# Altium PCB Power_Inverter_350VDC.PcbDoc (part 3 of 3)
Units mm, origin at the board's own origin, x right, y up, seen from the top; angles counter-clockwise.
Board outline 340.25 x 180.25 mm, 2 copper layers (Top Layer, Bottom Layer); 181 components, 76 nets, 433 pads, 298 vias.
Unrouted connection lines stored in the file: 1.
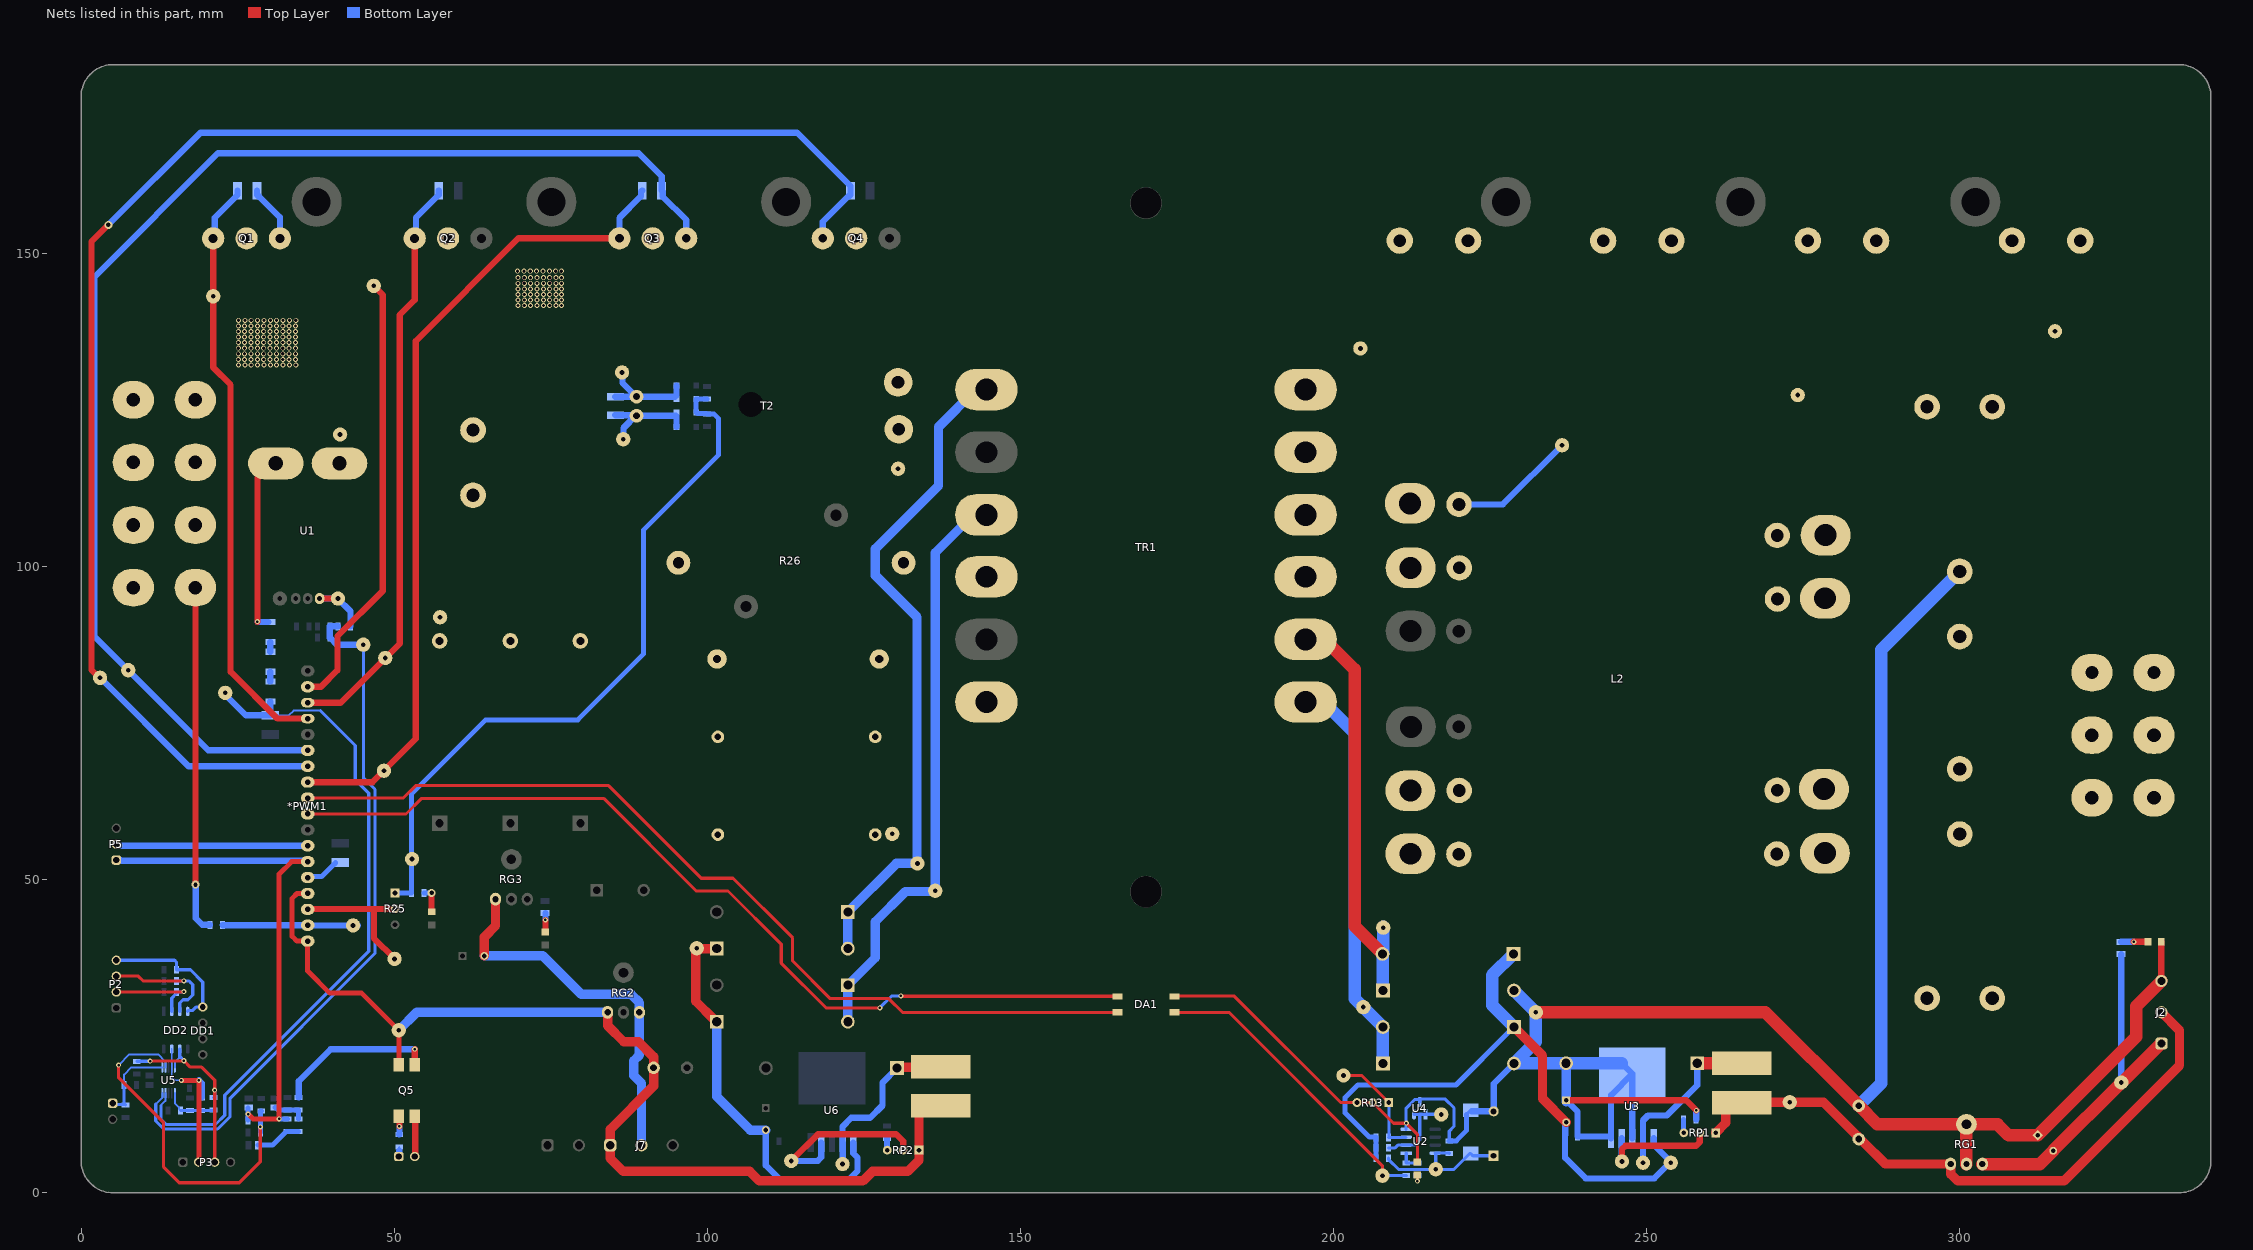
[diagram p2: the nets of this part, all layers, seen from the top]

## Via types
v1: diameter 0.8, hole 0.5, Top Layer to Bottom Layer, 266 vias
v2: diameter 0.8, hole 0.4, Top Layer to Bottom Layer, 28 vias
v3: diameter 1.27, hole 0.711, Top Layer to Bottom Layer, 4 vias

## Nets (pads, with @x,y where several pads share a name; then routed paths per layer and width w, separated by ;. In a path a pad name is that pad's centre, name@x,y a point inside that pad or via, vN(x,y) a via of type N, cw(c..) or ccw(c..) an arc to the next point about the centre after c; other vN are vias at no path point) (continued)
GND_II: C1.1 C2.1 C3.1 C4.2 C5.1 C6.2 C16.2 C30.2 CR1.2 D2.2 D4.2 D5.2 D6.2 D7.2 DA1.2 J2.3 J6.1 R10.1 R13.2 R13.3 RG1.2 TP14.1 TP16.1 U2.4 U3.3 U3.5 U3.6 U4.3 VD2.3 VD3.3 | length 413.8
  Top Layer w0.5: DA1.2@174.176,31.325 184.125,31.325 201.124,14.326 R13.3@203.71,14.326 R13.2@206.25,14.326 209.552,11.024 v2(211.584,11.024) 213.362,9.246 D7.2@213.362,4.835
  Top Layer w1: C1.1@237.125,14.675 256.325,14.675 v2(257.925,13.075) ; J2.3@332.2,33.775 D4.2@332.2,40.025
  Top Layer w2: TP14.1@232.285,28.733 268.959,28.733 C4.2@283.875,13.817 286.842,10.85 RG1.2@301.085,10.85 ; RG1.2@301.085,4.5 RG1.2@301.085,10.85 ; J2.3@332.225,33.75 328.175,29.7 328.175,24.8 C2.1@312.463,9.087 307.831,9.087 306.069,10.85 RG1.2@301.085,10.85
  Bottom Layer w0.5: U2.4@211.561,10.055 211.561,13.414 212.945,14.798 213.684,14.798 U4.3@213.743,14.739 ; U4.3@213.743,14.414 U4.3@213.743,14.739 ; C5.1@218.442,8.214 218.442,9.754 219.204,10.516 219.204,13.478 217.817,14.865 213.743,14.865 U4.3@213.743,14.739 ; C6.2@221.236,12.442 C6.2@221.871,13.077 C6.2@222.025,12.923
  Bottom Layer w0.8: C5.1@218.442,8.214 219.569,8.214 221.236,9.881 C6.2@221.236,12.442
  Bottom Layer w1: C6.2@222.025,12.923 D5.2@225.554,12.923 225.554,17.318 D6.2@228.785,20.549 ; C1.1@236.975,14.325 C1.1@237.135,14.485 ; C1.1@237.125,14.675 238.95,12.85 C3.1@238.95,8.9 244.292,8.9 U3.5@244.3,8.892 ; U3.5@244.3,8.609 U3.5@244.3,8.892 ; U3.6@246.018,20.6 U3.6@247.704,18.914 ; U3.3@247.704,8.609 U3.6@247.704,18.914 ; R10.1@257.9,11.625 257.912,11.638 257.912,13.062 v2(257.925,13.075) ; U3.5@244.3,8.892 244.3,15.51 U3.6@247.704,18.914
  Bottom Layer w1.5: D6.2@228.785,20.549 D6.2@228.81,20.575 ; CR1.2@237.11,20.575 CR1.2@237.135,20.6 C1.1@237.135,14.435
  Bottom Layer w2: D2.2@228.785,32.233 TP14.1@232.285,28.733 232.285,24.049 228.81,20.575 CR1.2@237.11,20.575 ; CR1.2@237.135,20.6 U3.6@246.018,20.6 ; C4.2@283.875,13.817 287.45,17.392 287.45,86.632 C30.2@300,99.182
GND_ISOL: C19.2 DD1.1 DD2.4 P2.4 | length 22.7
  Bottom Layer w0.5: P2.4@5.509,37.059 14.806,37.059 15.099,36.766 C19.2@15.099,35.535 17.34,35.535 19.306,33.569 DD1.1@19.306,29.596 19.276,29.566 18.214,29.566 17.655,29.007 16.944,29.007 16.898,28.961 DD2.4@16.898,28.883
Net*PWM1_1: *PWM1.1 *PWM1.4 C21.1 J7.1 L3.2 Q5.4 RG2.1 RP2.1 TP35.1 | length 168.8
  Top Layer w0.8: *PWM1.4@36.07,47.727 34.377,47.727 33.6,46.95 33.6,40.875 34.368,40.107 *PWM1.1@36.07,40.107 36.07,35.33 39.6,31.8 44.7,31.8 TP35.1@50.625,25.875 ; TP35.1@50.625,25.325 50.625,20.355 Q5.4@50.63,20.35
  Top Layer w1.5: RG2.1@83.985,28.725 84.038,28.672 84.038,26.562 86.575,24.025 88.925,24.025 91.341,21.609 91.341,16.966 84.4,10.025 J7.1@84.4,7.5 84.4,5.4 86.475,3.325 106.7,3.325 108.225,1.8 124.775,1.8 126.3,3.325 131.95,3.325 133.74,5.115 RP2.1@133.74,6.725 133.74,12.675 134.865,13.8 L3.2@137.225,13.8
  Bottom Layer w1.5: TP35.1@50.625,25.875 53.475,28.725 RG2.1@83.985,28.725
Net*PWM1_2: *PWM1.2 R19.2 TP21.1 | length 21.6
  Bottom Layer w1: R19.2@22.475,42.7 22.528,42.647 32.371,42.647 *PWM1.2@36.07,42.647 36.093,42.624 TP21.1@43.326,42.624 43.35,42.6 TP21.1@44.05,42.6
Net*PWM1_3: *PWM1.3 R25.2 TP28.1 | length 23.3
  Top Layer w1: *PWM1.3@36.114,45.231 46.65,45.231 ; TP28.1@49.95,37.275 46.65,40.575 46.65,45.231 ; R25.2@49.981,45.231 46.65,45.231
  Bottom Layer w1: *PWM1.3@36.07,45.187 *PWM1.3@36.114,45.231 ; R25.2@49.981,45.231 R25.2@50.025,45.275 R25.2@50.031,45.281
Net*PWM1_5: *PWM1.5 R20.2 | length 5.5
  Bottom Layer w0.8: *PWM1.5@36.07,50.267 36.207,50.404 38.266,50.404 40.213,52.351 40.274,52.351 40.515,52.592 R20.2@40.515,52.653
Net*PWM1_6: *PWM1.6 C28.1 P5.1 R24.2 R47.2 | length 83.1
  Top Layer w0.8: v2(26.568,12.479) 27.323,11.725 v2(31.525,11.725) 31.525,50.825 33.507,52.807 *PWM1.6@36.07,52.807
  Bottom Layer w0.5: R47.2@26.513,11.457 R47.2@26.568,11.513 ; C28.1@26.568,13.446 C28.1@26.624,13.501
  Bottom Layer w0.8: R47.2@26.568,11.513 v2(26.568,12.479) C28.1@26.568,13.446 ; v2(31.525,11.725) 31.555,11.695 R24.2@32.847,11.695
  Bottom Layer w1: P5.1@6.225,53.061 6.352,52.934 35.943,52.934 *PWM1.6@36.07,52.807
Net*PWM1_7: *PWM1.7 P5.2 | length 29.8
  Bottom Layer w1: 6.227,55.347 *PWM1.7@36.07,55.347
Net*PWM1_9: *PWM1.9 DA1.3 | length 146.9
  Top Layer w0.5: *PWM1.9@36.07,60.427 51.777,60.427 54.275,62.925 83.35,62.925 98.15,48.125 103.225,48.125 111.725,39.625 111.725,36.6 118.9,29.425 127.45,29.425 v2(127.475,29.45) ; v2(130.825,31.35) 130.865,31.31 165.387,31.31 DA1.3@165.427,31.27
  Bottom Layer w0.5: v2(127.475,29.45) 129.375,31.35 v2(130.825,31.35)
Net*PWM1_10: *PWM1.10 DA1.4 | length 147.7
  Top Layer w0.5: *PWM1.10@36.07,62.967 51.342,62.967 53.325,64.95 84.15,64.95 98.95,50.15 104.025,50.15 113.55,40.625 113.55,36.925 119.55,30.925 128.9,30.925 131.1,28.725 DA1.4@165.825,28.725
Net*PWM1_11: *PWM1.11 Q3.1 R29.2 TP30.1 | length 132.2
  Top Layer w1: *PWM1.11@36.07,65.507 46.407,65.507 53.325,72.425 53.325,135.975 69.737,152.387 Q3.1@85.868,152.387
  Bottom Layer w1: Q3.1@85.868,152.387 85.868,155.643 89.308,159.083 89.308,159.82 R29.2@89.51,160.022
Net*PWM1_12: *PWM1.12 Q4.1 R31.2 TP34.1 | length 251.3
  Top Layer w1: TP34.1@2.654,82.329 1.525,83.458 1.525,151.85 v3(4.225,154.55)
  Bottom Layer w1: TP34.1@2.9,82.175 17.028,68.047 *PWM1.12@36.07,68.047 ; v3(4.225,154.55) 18.95,169.275 114.259,169.275 122.811,160.723 122.811,159.321 122.609,159.119 122.444,159.119 118.368,155.043 Q4.1@118.368,152.387
Net*PWM1_13: *PWM1.13 Q3.3 Q4.2 R29.1 T2.1 TP33.1 | length 211
  Bottom Layer w1: *PWM1.13@36.07,70.587 20.188,70.587 7.388,83.388 2.025,88.75 2.025,146.275 21.725,165.975 88.975,165.975 92.65,162.3 92.65,160.06 R29.1@92.612,160.022 92.814,159.82 92.814,159.061 96.536,155.339 Q3.3@96.536,152.387
Net*PWM1_15: *PWM1.15 Q1.1 R18.2 TP19.1 | length 95.1
  Top Layer w1: Q1.1@20.968,152.387 20.968,143.125 20.968,131.757 23.751,128.974 23.751,83.16 31.244,75.667 *PWM1.15@36.07,75.667
  Bottom Layer w1: Q1.1@20.968,152.387 21.208,152.627 21.208,155.662 24.867,159.321 R18.2@24.867,160.022
Net*PWM1_16: *PWM1.16 Q2.1 R22.2 TP23.1 | length 93.6
  Top Layer w1: *PWM1.16@36.07,78.207 41.332,78.207 50.775,87.65 50.775,140.156 53.168,142.549 Q2.1@53.168,152.387
  Bottom Layer w1: Q2.1@53.168,152.387 53.366,152.585 53.366,155.662 57.025,159.321 R22.2@57.025,160.022
Net*PWM1_17: *PWM1.17 C10.2 C11.2 Q1.3 Q2.2 R18.1 TP20.1 | length 80.1
  Top Layer w1: *PWM1.17@36.07,80.747 38.197,80.747 40.825,83.375 40.825,88.8 48.075,96.05 48.075,143.35 TP20.1@46.625,144.8
  Bottom Layer w1: R18.1@27.969,160.022 27.969,159.321 28.171,159.119 28.281,159.119 31.636,155.764 Q1.3@31.636,152.387
  other v1: 69.657,141.656 70.673,141.656 71.689,141.656 72.705,141.656 73.721,141.656 74.737,141.656 75.753,141.656 76.642,141.656 69.657,142.545 70.673,142.545 71.689,142.545 72.705,142.545 73.721,142.545 74.737,142.545 75.753,142.545 76.642,142.545 69.657,143.434 70.673,143.434 71.689,143.434 72.705,143.434 73.721,143.434 74.737,143.434 75.753,143.434 76.642,143.434 69.657,144.323 70.673,144.323 71.689,144.323 72.705,144.323 73.721,144.323 74.737,144.323 75.753,144.323 76.642,144.323 69.657,145.212 70.673,145.212 71.689,145.212 72.705,145.212 73.721,145.212 74.737,145.212 75.753,145.212 76.642,145.212 69.657,146.101 70.673,146.101 71.689,146.101 72.705,146.101 73.721,146.101 74.737,146.101 75.753,146.101 76.642,146.101 69.596,147.142 70.612,147.142 71.628,147.142 72.644,147.142 73.66,147.142 74.676,147.142 75.692,147.142 76.581,147.142
NetC1_2: C1.2 C3.2 D1.1 D3.1 R2.2 R3.2 R4.2 TP5.1 U3.1 | length 106.8
  Top Layer w1.5: D3.1@228.785,26.391 233.35,21.826 233.35,14.95 C1.2@237.125,11.175
  Bottom Layer w0.8: R4.2@206.774,5.436 R2.2@206.774,7.087 206.774,8.783 205.697,8.783 201.805,12.675 201.805,15.088 203.837,17.12 219.514,17.12 228.085,25.691 D3.1@228.785,26.391
  Bottom Layer w1: C1.2@236.975,10.775 236.975,9.15 236.95,9.125 C3.2@236.95,8.9 236.95,5.475 240.225,2.2 251.2,2.2 253.85,4.85 251.116,7.584 251.108,7.592 U3.1@251.108,8.609
  Bottom Layer w2: D1.1@228.714,38.075 225.3,34.661 225.3,29.876 D3.1@228.785,26.391
NetC2_2: C2.2 J2.1 R5.2 RG1.3 TP4.1 | length 56.9
  Top Layer w2: RG1.3@303.625,4.497 RG1.3@303.625,4.5 312.825,4.5 C2.2@314.937,6.613 314.937,6.637 TP4.1@325.825,17.525 325.902,17.525 326.045,17.668 326.066,17.668 J2.1@332.148,23.75
  Bottom Layer w1: TP4.1@325.825,17.602 R5.2@325.825,38
NetC4_1: C4.1 J2.2 L1.2 RG1.1 RP1.1 TP1.1 | length 101
  Top Layer w1.5: RP1.1@261.015,9.475 262.619,11.079 262.619,13.2 263.744,14.325 L1.2@265.2,14.325 265.25,14.375 TP1.1@272.85,14.375 278.25,14.375 283.625,9 283.625,8.868 283.877,8.617 284.008,8.617 284.008,8.485 284.26,8.233 284.392,8.233 288.125,4.5 RG1.1@298.545,4.5 298.598,4.447 298.598,2.877 299.675,1.8 316.675,1.8 335.125,20.25 335.125,25.85 J2.2@332.225,28.75
NetC5_2: C5.2 C6.1 D5.1 R4.1 TP6.1 U2.8 | length 23.8
  Bottom Layer w0.5: R4.1@208.774,5.436 208.774,5.211 210.362,3.623 219.167,3.623 221.721,6.177 C6.1@221.871,6.177 222.225,5.823 D5.1@225.554,5.823 ; TP6.1@216.283,3.658 216.283,6.225 216.263,6.245 U2.8@216.193,6.245 216.201,6.236 218.419,6.236 C5.2@218.442,6.214
NetC7_1: C7.1 R8.1 R12.2 TP13.1 U5.5 | length 112.8
  Bottom Layer w0.3: 11.8,14.075 12.845,15.12 U5.5@12.845,15.832
  Bottom Layer w0.5: 11.8,14.075 11.8,11.375 13.075,10.1 21.675,10.1 23.675,12.1 23.675,15 46.825,38.15 46.825,64.35 44.96,66.215 TP13.1@44.96,87.478
  Bottom Layer w1: R8.1@40.912,90.399 R12.2@39.61,90.399 C7.1@39.61,88.621 39.61,88.596 39.71,88.496 39.735,88.496 40.753,87.478 TP13.1@44.96,87.478
NetC9_2: C9.2 J3.1 J9.1 R15.2 R16.2 R17.2 R19.1 TP18.1 | length 55.6
  Top Layer w1: J3.1@18.13,96.593 18.14,96.583 18.14,49.16 v3(18.15,49.15)
  Bottom Layer w1: v3(18.15,49.15) 18.175,49.125 18.175,43.775 19.219,42.731 20.444,42.731 R19.1@20.475,42.7
NetC10_1: C10.1 C11.1 C14.2 TP26.1 TR1.1
NetC12_1: C12.1 C13.1 D9.2 D11.2 R23.2 R25.1 TP24.1 | length 115.2
  Bottom Layer w0.8: R25.1@50.025,47.815 R23.2@52.692,47.815 52.692,52.15 52.692,53.225 52.692,63.667 64.5,75.475 79.225,75.475 89.75,86 89.75,105.825 101.725,117.8 101.725,123.575 101.008,124.292 C12.1@99.875,124.292 99.775,124.392 98.318,124.392 D11.2@98.148,124.562 D9.2@98.148,126.721 99.859,126.721 C13.1@99.875,126.737
NetC14_1: C14.1 R26.2
NetC15_2: C15.2 C16.1 J5.1 L2.1 L2.2 L2.3 L2.4
NetC17_2: C17.2 P1.1 R32.1 U5.6 | length 13.3
  Bottom Layer w0.3: R32.1@6.749,17.12 6.749,18.774 7.907,19.932 U5.6@12.845,19.932
  Bottom Layer w0.5: P1.1@4.909,14.199 5.079,14.029 6.887,14.029 C17.2@6.987,13.929 ; C17.2@6.71,14.206 R32.1@6.71,17.12
NetC20_2: C20.2 C29.2 D13.1 D15.1 TP38.1 U6.1 | length 65.1
  Top Layer w1.5: TP38.1@97.862,38.918 D15.1@101.42,38.918 ; TP38.1@98.075,38.612 98.075,30.508 100.999,27.584 101.07,27.584 101.349,27.305 D13.1@101.349,27.234
  Bottom Layer w1: C20.2@109.25,9.925 109.25,4.275 111.65,1.875 122.4,1.875 123.925,3.4 123.925,5.525 123.239,6.211 123.239,7.9 U6.1@123.231,7.908
  Bottom Layer w1.5: D13.1@101.42,27.234 101.42,15.28 106.775,9.925 C20.2@109.25,9.925
NetC22_2: C22.2 J7.2 RG2.3 RG3.1 | length 61.4
  Top Layer w1.5: C22.2@64.3,37.75 64.3,40.775 66.077,42.552 RG3.1@66.077,46.827
  Bottom Layer w1.5: C22.2@64.3,37.75 73.65,37.75 79.8,31.6 87.75,31.6 89.062,30.288 89.062,28.98 89.065,28.977 89.065,21.915 88.15,21 88.15,18.65 89.4,17.4 J7.2@89.4,7.5
NetC24_1: C24.1 R24.1 R44.2 | length 7.4
  Bottom Layer w0.8: C24.1@28.136,7.52 30.447,7.52 32.622,9.695 R24.1@32.847,9.695 R44.2@34.625,9.695
NetC25_1: C25.1 R44.1 R45.2 R46.1 | length 5.4
  Bottom Layer w0.8: C25.1@30.815,13.501 31.015,13.501 31.392,13.124 R45.2@34.625,13.124 R44.1@34.625,11.695
NetC26_2: C26.2 R47.1 R48.2 U5.7 | length 55.9
  Top Layer w0.5: v2(5.875,20.3) 5.875,18.275 13.05,11.1 13.05,4 15.55,1.5 25.15,1.5 28.5,4.85 v2(28.5,10.425)
  Bottom Layer w0.3: v2(5.875,20.3) 7.6,22.025 12.159,22.025 13.345,20.839 U5.7@13.345,19.932
  Bottom Layer w0.8: R48.2@28.513,9.552 R47.1@28.513,11.457 28.513,12.997 C26.2@28.656,12.997
NetC27_2: C27.2 C30.1
NetCR1_1: CR1.1 L1.1 TP2.1 U3.2 | length 28.4
  Top Layer w1: L1.1@265.175,20.6 L1.1@265.2,20.575
  Top Layer w2: CR1.1@258.075,20.6 L1.1@265.175,20.6
  Bottom Layer w1: TP2.1@249.403,4.703 249.403,8.606 U3.2@249.406,8.609 249.406,11.456 250.2,12.25 253.225,12.25 258.075,17.1 CR1.1@258.075,20.6
NetCR2_1: CR2.1 L3.1 TP36.1 U6.2 | length 27.7
  Top Layer w1.5: CR2.1@130.215,19.825 130.328,19.938 137.113,19.938 L3.1@137.225,20.05
  Bottom Layer w1: U6.2@121.525,7.897 121.525,10.5 122.9,11.875 125.925,11.875 127.9,13.85 127.9,17.51 CR2.1@130.215,19.825 ; TP36.1@121.54,4.611 U6.2@121.54,7.897
NetD1_2: D1.2 D2.1 TP3.1 TR1.8 | length 67.9
  Top Layer w1: D2.1@207.809,32.269 D2.1@207.845,32.233
  Top Layer w2: TR1.8@195.502,90.322 196.548,90.322 203.329,83.541 203.329,42.52 D1.2@207.774,38.075
  Bottom Layer w2: D1.2@207.812,37.983 207.845,37.95 D2.1@207.845,32.233 ; D1.2@207.901,38.202 TP3.1@207.901,42.393
NetD3_2: D3.2 D6.1 TP11.1 TR1.7 | length 65.4
  Bottom Layer w2: TR1.7@195.502,80.322 196.388,80.322 203.329,73.381 203.329,30.907 D3.2@207.845,26.391 D6.1@207.845,20.549
NetD4_1: D4.1 R5.1 | length 4.3
  Top Layer w1: v2(327.825,40) 330.05,40 D4.1@330.05,39.975
  Bottom Layer w1: R5.1@325.8,39.975 325.825,40 v2(327.825,40)
NetD7_1: D7.1 R9.2 | length 1.9
  Top Layer w0.5: v2(213.362,1.753) D7.1@213.362,2.735
  Bottom Layer w0.5: v2(213.362,1.753) R9.2@213.362,2.658
NetD8_2: D8.2 D9.1 R21.2 T2.3 TP22.1 | length 16.3
  Bottom Layer w1: R21.2@85.225,127.076 85.238,127.089 88.508,127.089 88.521,127.102 94.744,127.102 94.998,127.356 D8.2@94.998,128.88 ; TP22.1@86.3,131.08 86.355,131.025 86.355,129.292 T2.3@88.515,127.132
NetD10_2: D10.2 D11.1 R21.1 T2.4 TP27.1 | length 16.4
  Bottom Layer w1: R21.1@85.225,124.174 85.285,124.114 88.461,124.114 88.521,124.054 94.871,124.054 94.998,123.927 D10.2@94.998,122.276 ; TP27.1@86.525,120.068 86.525,122.094 T2.4@88.515,124.084
NetD12_1: D12.1 R23.1 | length 4.2
  Top Layer w1: D12.1@55.867,44.801 v3(55.867,47.815)
  Bottom Layer w0.8: R23.1@54.692,47.815 v3(55.867,47.815)
NetD13_2: D13.2 D14.1 TP39.1 TR1.4 | length 94.1
  Bottom Layer w1.5: D13.2@122.36,27.234 D14.1@122.36,33.076 126.75,37.466 126.75,43.2 131.582,48.032 136.207,48.032 TP39.1@136.325,48.15 136.325,102.15 142.397,108.222 TR1.4@144.502,108.222
NetD15_2: D15.2 D17.1 TP41.1 TR1.6 | length 107
  Bottom Layer w1.5: D15.2@122.36,38.918 D17.1@122.36,44.76 130.125,52.525 TP41.1@133.475,52.525 ; TP41.1@133.425,52.525 133.425,91.875 126.775,98.525 126.775,102.8 136.85,112.875 136.85,122.27 142.802,128.222 TR1.6@144.502,128.222
NetD16_1: D16.1 R41.1 | length 3
  Top Layer w1: D16.1@74.05,41.6 v2(74.05,43.5)
  Bottom Layer w1: v2(74.05,43.5) R41.1@74.05,44.575
NetDA1_1: DA1.1 R6.1 TP8.1 | length 48.7
  Top Layer w0.5: DA1.1@174.587,28.7 183.3,28.7 207.758,4.242 207.758,2.658 TP8.1@207.774,2.642
  Bottom Layer w0.5: TP8.1@207.774,2.642 211.203,2.642 211.211,2.65 211.576,2.65 R6.1@211.584,2.658
NetDD2_2: DD2.2 P2.2 R37.1 | length 15.3
  Top Layer w0.5: P2.2@5.654,32.042 5.694,32.002 16.277,32.002 v2(16.3,32.025)
  Bottom Layer w0.5: DD2.2@14.358,28.883 14.358,31.013 15.099,31.754 R37.1@15.099,31.979 15.122,32.002 16.277,32.002 v2(16.3,32.025)
NetDD2_3: DD2.3 P2.3 R35.1 | length 19.5
  Top Layer w0.5: P2.3@5.509,34.519 9.019,34.519 9.788,33.75 v2(16.275,33.75)
  Bottom Layer w0.5: R35.1@15.099,33.757 15.103,33.754 16.271,33.754 v2(16.275,33.75) 17.125,33.75 17.4,33.475 17.407,33.475 17.7,33.182 17.7,31.5 16.95,30.75 16.15,30.75 15.628,30.228 DD2.3@15.628,28.883
NetDD2_6: DD2.6 P3.3 R36.1 R39.1 U5.10 | length 32.3
  Top Layer w0.5: v2(10.9,20.95) 10.925,20.975 16.275,20.975 v2(16.3,21) 17.325,19.975 19.125,19.975 21.214,17.886 21.214,16.293 21.214,4.804 P3.3@21.211,4.801
  Bottom Layer w0.3: U5.10@14.845,19.932 14.845,20.77 15.628,21.553
  Bottom Layer w0.5: R36.1@8.775,20.875 8.812,20.913 10.863,20.913 v2(10.9,20.95) ; 15.628,21.553 DD2.6@15.628,22.883 ; 15.687,21.612 v2(16.3,21) ; R39.1@21.043,15.1 21.068,15.1 21.218,15.25 v2(21.218,16.293)
NetDD2_7: DD2.7 P3.2 R34.1 R38.1 U5.9 | length 25.2
  Top Layer w0.8: v2(15.9,17.875) v2(18.7,17.875) 18.7,4.83 P3.2@18.671,4.801
  Bottom Layer w0.3: DD2.7@14.358,22.883 14.345,22.87 U5.9@14.345,19.932 14.345,18.455 14.925,17.875 v2(15.9,17.875) ; R38.1@19.052,15.072 R38.1@19.163,15.183
  Bottom Layer w1: v2(18.7,17.875) 19.163,17.412 R38.1@19.163,15.183
NetL2_5: L2.5 L2.6 L2.7 L2.8 TP29.1 TR1.9 TR1.10 | length 20.4
  Bottom Layer w1: L2.5@220.011,109.876 227.026,109.876 TP29.1@236.475,119.325
NetP4_1: P4.1 R42.1 | length 0.8
  Bottom Layer w0.3: R42.1@50.68,7.18 R42.1@50.7,7.2
  Bottom Layer w1: P4.1@50.705,5.825 50.705,6.63
NetP4_2: P4.2 Q5.2 | length 6.5
  Top Layer w0.3: Q5.2@53.17,12.15 Q5.2@53.245,12.075
  Top Layer w1: P4.2@53.18,5.69 53.245,5.756 Q5.2@53.245,12.075
NetQ1_2: Q1.2 Q3.2 R1.2 U1.5 | length 28.9
  Top Layer w0.254: U1.5@28.196,114.205 30.425,116.434 U1.5@30.99,116.434
  Top Layer w1: v2(28.05,91.15) 28.05,114.121 28.134,114.205 U1.5@28.196,114.205
  Bottom Layer w0.254: R1.2@29.801,91.11 R1.2@30.101,91.11
  Bottom Layer w1: v2(28.05,91.15) 28.09,91.11 R1.2@29.801,91.11
  other v1: 25.021,132.182 26.037,132.182 27.053,132.182 28.069,132.182 29.085,132.182 30.101,132.182 31.117,132.182 32.133,132.182 33.149,132.182 34.165,132.182 24.983,133.054 25.999,133.054 27.015,133.054 28.031,133.054 29.047,133.054 30.063,133.054 31.079,133.054 32.095,133.054 33.111,133.054 34.127,133.054 24.983,133.943 25.999,133.943 27.015,133.943 28.031,133.943 29.047,133.943 30.063,133.943 31.079,133.943 32.095,133.943 33.111,133.943 34.127,133.943 24.983,134.832 25.999,134.832 27.015,134.832 28.031,134.832 29.047,134.832 30.063,134.832 31.079,134.832 32.095,134.832 33.111,134.832 34.127,134.832 24.983,135.721 25.999,135.721 27.015,135.721 28.031,135.721 29.047,135.721 30.063,135.721 31.079,135.721 32.095,135.721 33.111,135.721 34.127,135.721 24.983,136.61 25.999,136.61 27.015,136.61 28.031,136.61 29.047,136.61 30.063,136.61 31.079,136.61 32.095,136.61 33.111,136.61 34.127,136.61 24.983,137.499 25.999,137.499 27.015,137.499 28.031,137.499 29.047,137.499 30.063,137.499 31.079,137.499 32.095,137.499 33.111,137.499 34.127,137.499 24.983,138.388 25.999,138.388 27.015,138.388 28.031,138.388 29.047,138.388 30.063,138.388 31.079,138.388 32.095,138.388 33.111,138.388 34.127,138.388 25.021,139.294 26.037,139.294 27.053,139.294 28.069,139.294 29.085,139.294 30.101,139.294 31.117,139.294 32.133,139.294 33.149,139.294 34.165,139.294
NetQ5_1: Q5.1 R42.2 | length 3
  Top Layer w0.3: Q5.1@50.63,12.15 Q5.1@50.7,12.08
  Top Layer w1: Q5.1@50.7,12.08 50.725,12.055 v2(50.725,10.5)
  Bottom Layer w0.3: R42.2@50.675,9.225 R42.2@50.7,9.2
  Bottom Layer w1: R42.2@50.675,9.225 50.725,9.275 v2(50.725,10.5)
NetQ5_3: Q5.3 R45.1 | length 25.9
  Top Layer w0.3: Q5.3@53.025,20.495 Q5.3@53.17,20.35
  Top Layer w1: Q5.3@53.025,20.495 53.175,20.645 53.173,20.647 53.173,22.848 v2(53.175,22.85)
  Bottom Layer w1: R45.1@34.625,15.124 34.625,17.75 39.725,22.85 v2(53.175,22.85)
NetR1_1: R1.1 R7.2 | length 1.6
  Bottom Layer w1: R7.2@30.101,86.335 R1.1@30.101,87.91
NetR2_1: R2.1 TP12.1 U2.2 U4.1 U4.2 | length 14
  Bottom Layer w0.5: R2.1@208.774,7.087 209.806,7.087 210.234,7.515 212.901,7.515 213.743,8.357 213.743,12.46 ; U4.2@212.828,12.46 213.743,12.46 ; TP12.1@217.172,12.421 217.133,12.46 U4.1@214.658,12.46 213.743,12.46
NetR3_1: R3.1 R13.1 TP10.1 U2.3 | length 17.7
  Top Layer w0.5: TP10.1@201.551,18.644 204.472,18.644 R13.1@208.79,14.326
  Bottom Layer w0.5: TP10.1@201.551,18.644 TP10.1@201.975,18.644 ; R3.1@208.774,8.738 R3.1@208.797,8.761 ; R13.1@208.845,14.254 208.845,8.81 R3.1@208.797,8.761 ; U2.3@211.538,8.761 R3.1@208.797,8.761
NetR6_2: R6.2 R9.1 U2.1 | length 3.4
  Bottom Layer w0.5: U2.1@211.561,6.245 211.573,6.233 211.573,4.67 R6.2@211.584,4.658 R9.1@213.362,4.658
NetR7_1: R7.1 R11.2 | length 1.5
  Bottom Layer w1: R11.2@30.101,81.585 R7.1@30.101,83.135
NetR8_2: R8.2 TP9.1 U1.3 | length 11.1
  Top Layer w1: U1.3@37.975,94.844 TP9.1@40.896,94.844
  Bottom Layer w1: U1.3@37.975,94.844 TP9.1@40.896,94.844 42.912,92.828 R8.2@42.912,90.399
NetR10_2: R10.2 RP1.3 | length 2.2
  Bottom Layer w0.8: R10.2@255.9,11.625 255.9,9.51 RP1.3@255.935,9.475
NetR11_1: R11.1 R14.2 TP15.1 U5.4 | length 112.3
  Bottom Layer w0.3: 12.625,13.875 13.345,14.595 U5.4@13.345,15.832 ; R14.2@30.101,76.202 33.077,76.202 33.825,76.95 38.1,76.95
  Bottom Layer w0.5: 12.625,13.875 12.625,11.65 13.45,10.825 21.35,10.825 22.825,12.3 22.825,15.5 45.825,38.5 45.825,63.75 43.675,65.9 43.675,71.375 38.1,76.95
  Bottom Layer w1: TP15.1@22.9,79.775 22.9,79.5 26.198,76.202 R14.2@30.101,76.202 R11.1@30.101,78.385
NetR26_1: R26.1 T2.2 TP32.1 TR1.3 | length 0.3
  Bottom Layer w0.254: R26.1@131.286,100.559 R26.1@131.404,100.44 ; TR1.3@144.384,100.44 TR1.3@144.502,100.322
NetR33_1: R33.1 R38.2 R39.2 R40.2 U5.1 | length 8.2
  Bottom Layer w0.3: U5.1@14.845,15.832 14.845,14.215 15.484,13.576 15.484,13.306 R40.2@15.734,13.056 R40.2@15.75,13.072
  Bottom Layer w0.5: R40.2@15.75,13.072 R33.1@17.274,13.072 R38.2@19.052,13.072 R39.2@20.83,13.072
NetR43_2: R43.2 RP2.3 | length 1.9
  Bottom Layer w1: R43.2@128.625,8.6 128.642,8.582 128.642,6.743 RP2.3@128.66,6.725
NetRP1_2: RP1.2 TP7.1 U3.4 | length 20.1
  Top Layer w1: TP7.1@246.038,4.912 246.038,6.839 246.624,7.425 257.889,7.425 258.475,8.011 RP1.2@258.475,9.475
  Bottom Layer w1: U3.4@246.002,8.609 246.002,4.948 TP7.1@246.075,4.875
NetRP2_2: RP2.2 TP40.1 U6.4 | length 28.9
  Top Layer w1: TP40.1@113.325,5 117.6,9.275 130.075,9.275 131.2,8.15 RP2.2@131.2,6.725
  Bottom Layer w1: TP40.1@113.325,5 117.539,5 118.125,5.586 U6.4@118.125,7.908
NetTP25_1: TP25.1 TR1.11 VD1.3 VD3.1
NetTP31_1: TP31.1 TR1.12 VD2.1 VD4.3
VCC: C9.1 J1.1 J8.1 TP17.1 U1.4
"VCC +320": C15.1 C27.1 J4.1 VD1.1 VD4.1
pads on no net: L2.9 L2.10 R26.GND Radiator_1.1 Radiator_2.1 T2.106 TR1.0 TR1.2 TR1.5 U2.5 U2.6 U2.7 U5.2

## Polygon pours and split planes (outlines as drawn)
NetC27_2 on Bottom Layer "NONET_L-01_P-001" (solid, pour order 27): 301.625,65.275 298.241,65.275 295.7,67.816 295.7,68.9 295.7,89 298,91.3 301.325,91.3 303.75,88.875 303.75,67.4
GND_II on Bottom Layer "NONET_L-01_P-001" (solid, pour order 16): 283.2,149.5 283.2,167.7 292.575,177.075 321.175,177.075 335.002,163.248 335.002,78.969 315.156,78.969 307.654,86.471 307.654,91.396 302.975,96.075 299.277,96.075 297.5,97.589 297.5,100.4 297.5,118.75 301.675,122.925 301.675,128.931 314.581,141.407 314.581,155.296 305.818,164.059 299.595,164.059 295.277,159.741 295.277,149.5
GND on Bottom Layer "NONET_L-01_P-001" (solid, pour order 25): 126.9,154.475 126.9,150.975 124.625,148.7 120.275,148.7 113.55,141.975 113.55,122.825 104.375,113.65 104.375,100.65 109.9,95.125 109.9,76.85 103.125,70.075 64,70.075 55.15,61.225 55.15,56.075 59.7,51.525 105.55,51.525 123.425,69.4 123.425,100.65 117.175,106.9 117.175,109.875 125.775,118.475 125.775,131.85 138.55,144.625 138.55,171.6 132.6,177.55 122.425,177.55 122.425,164.9 125.2,162.125 125.2,157.025 126.9,155.325
NetTP31_1 on Bottom Layer "NONET_L-01_P-001" (solid, pour order 22): 189.875,124.8 189.85,124.825 189.85,165.575 201.15,176.875 272.2,176.875 280.625,168.45 280.625,149.475 273.2,149.475 270.95,151.725 270.95,161.1 268,164.05 261.9,164.05 257.05,159.2 234.85,159.2 230.25,163.8 224.775,163.8 217.025,156.05 208.912,156.05 206.5,153.638 206.5,148.775 208.275,147 208.275,134.975 202.175,128.875 202.175,124.828
"VCC +320" on Bottom Layer "NONET_L-01_P-001" (solid, pour order 17): 335.033,77.075 312.812,77.075 306.125,70.557 306.125,66.275 302.65,62.8 300.103,62.8 296.42,59.117 296.42,36.204 298.051,34.574 300.525,32.099 300.525,31.1 303.903,28.075 307.95,28.075 315.65,35.775 315.65,57.692 315.65,65.8 318.024,68.174 326.132,68.174 335.033,68.174
NetL2_5 on Bottom Layer "NONET_L-01_P-001" (solid, pour order 14): 189.486,112.37 205.869,112.37 207.774,114.275 225.837,114.275 236.6,103.512 236.6,59.535 226.443,49.378 208.028,49.378 208.028,67.92 218.545,67.92 223.141,72.516 223.141,91.542 220.347,94.336 189.486,94.336
NetC9_2 on Bottom Layer "NONET_L-01_P-001" (solid, pour order 11): 54.866,85.954 81.155,85.954 82.044,86.843 82.044,96.749 65.718,113.075 49.154,99.667 54.866,93.955
Net*PWM1_17 on Bottom Layer "NONET_L-01_P-001" (solid, pour order 2): 29.593,154.407 29.593,147.422 36.07,140.945 77.218,140.945 77.218,148.692 63.096,148.692 60.708,150.863 60.708,154.407 56.263,154.407 56.263,150.851 54.104,148.692 39.245,148.692 33.53,154.407
NetQ1_2 on Bottom Layer "NONET_L-01_P-001" (solid, pour order 7): 93.855,154.28 93.855,142.469 82.298,130.912 24.132,130.912 24.132,139.802 78.107,139.802 88.521,150.216 88.521,154.28
NetC14_1 on Bottom Layer "NONET_L-01_P-001" (solid, pour order 9): 99.443,82.398 91.95,89.891 91.95,101.956 93.474,103.48 98.046,103.48 99.824,101.702 99.824,94.082 104.65,89.256 104.65,84.303 102.745,82.398
NetC9_2 on Bottom Layer "NONET_L-01_P-001" (solid, pour order 8): 5.002,110.338 56.898,110.338 60.962,114.402 64.391,114.402 66.042,112.751 66.042,107.925 55.755,97.638 47.627,97.638 27.307,97.638 21.338,91.669 21.211,91.796 5.002,91.796
VCC on Bottom Layer "NONET_L-01_P-001" (solid, pour order 0): 5.082,112.497 23.497,112.497 23.497,116.053 27.18,119.736 34.673,119.736 36.705,117.704 36.705,114.783 37.975,113.513 55.12,113.513 65.407,123.8 65.407,125.832 61.343,129.896 5.082,129.896
NetR26_1 on Top Layer "NONET_L-01_P-001" (solid, pour order 4): 150.497,94.59 123.7,94.59 123.7,124.562 135.257,124.562 135.257,106.655 139.829,102.083 150.497,102.083
Net*PWM1_13 on Top Layer "NONET_L-01_P-001" (solid, pour order 3): 94.49,154.28 94.49,147.676 105.158,137.008 113.159,137.008 123.7,126.467 135.257,126.467 135.257,138.278 125.986,147.549 125.986,154.28 121.541,154.28 121.541,150.724 119.89,149.073 104.015,149.073 98.808,154.28
"VCC +320" on Top Layer "NONET_L-01_P-001" (solid, remove dead copper, pour order 23): 336.325,69.275 313.65,69.275 306.525,76.4 306.525,101.825 313.35,108.65 313.35,119.575 318.45,124.675 318.45,144.275 323.775,149.6 323.775,153.95 320.675,157.05 312.925,157.05 305.85,164.125 299.625,164.125 294.6,159.1 273.35,159.1 268.325,164.125 261.969,164.125 255.644,157.8 248.9,157.8 245.575,154.475 236.375,154.475 236.375,164.125 207.012,164.125 207.012,165.262 220.275,178.525 323.5,178.525 338.75,163.275 338.75,71.7
NetC15_2 on Top Layer "NONET_L-01_P-001" (solid, pour order 18): 334.7,66.45 334.7,57.559 315.766,38.625 303.225,38.625 299.313,34.713 299.313,30.913 296.425,28.025 289.198,28.025 273.687,43.536 267.972,49.251 267.972,109.195 278.927,120.15 285.257,120.15 293.168,128.061 296.51,128.04 299.313,125.237 299.313,113.313 294.375,108.375 294.375,94.958 292.85,93.433 292.85,67.325 297.375,62.8 303.475,62.8 307.125,66.45
GND_II on Top Layer "NONET_L-01_P-001" (solid, pour order 28): 305.625,128.5 303.45,128.5 301.825,126.875 301.825,112.05 297.55,107.775 297.55,97.75 298.925,96.375 302,96.375 304.45,98.825 304.45,103.5 309.575,108.625 309.575,128.5
NetC27_2 on Top Layer "NONET_L-01_P-001" (solid, pour order 26): 301.625,65.275 298.241,65.275 295.7,67.816 295.7,68.9 295.7,89 298,91.3 301.325,91.3 303.75,88.875 303.75,67.4
GND on Top Layer "NONET_L-01_P-001" (solid, pour order 24): 61.425,150.2 61.425,170.3 68.675,177.55 132.65,177.55 136.5,173.7 136.5,155.025 131.475,150 128.325,150 127.125,151.2 127.125,155.1 124.725,157.5 121.825,157.5 115.625,163.7 72.075,163.7 69.15,160.775 69.15,154.175 65.175,150.2
"VCC +320" on Top Layer "NONET_L-01_P-001" (solid, pour order 15): 207.012,149.708 207.012,165.262 215.842,174.092 237.365,174.092 246.382,165.075 246.382,151.282 244.808,149.708 240.286,149.708 233.682,156.312 233.682,160.376 230.253,163.805 224.792,163.805 214.886,153.899 214.886,151.519 213.075,149.708
NetTP25_1 on Top Layer "NONET_L-01_P-001" (solid, pour order 20): 189.875,122.7 189.875,114.475 191.225,113.125 206.5,113.125 208.25,114.875 227.175,114.875 236.25,123.95 284.575,123.95 291.525,130.9 301.675,130.9 311.65,140.875 311.65,152.55 309.836,154.364 306.922,154.364 303.333,150.775 294.286,150.775 290.111,146.6 264.8,146.6 256.7,154.7 251.8,154.7 249.6,152.5 249.6,147.6 247.55,145.55 230.85,145.55 213.875,128.575 206.25,128.575 200.375,122.7
NetTP31_1 on Top Layer "NONET_L-01_P-001" (solid, pour order 19): 189.85,124.776 189.85,139.875 195.375,145.4 213.075,145.4 218.125,150.45 218.125,152.4 219.9,154.175 222.525,154.175 225.95,150.75 225.95,143.15 213.075,130.275 205.075,130.275 199.576,124.776
NetC10_1 on Top Layer "NONET_L-01_P-001" (solid, pour order 5): 123.954,87.224 123.954,56.109 124.843,55.22 131.32,55.22 136.654,60.554 136.654,70.46 140.337,74.143 149.735,74.143 150.497,74.905 150.497,82.144 149.862,82.779 140.337,82.779 135.003,88.113 124.843,88.113
Net*PWM1_17 on Top Layer "NONET_L-01_P-001" (solid, pour order 10): 69.09,147.775 69.09,103.861 83.9,89.051 83.9,80.034 97.919,66.015 97.919,57.206 100.025,55.1 103.575,55.1 106.047,57.572 106.047,75.54 97.919,83.668 97.919,92.105 90.934,99.09 90.934,106.291 83.05,114.175 83.05,144.257 79.532,147.775
NetQ1_2 on Top Layer "NONET_L-01_P-001" (solid, pour order 1): 24.132,154.407 24.132,131.547 25.91,129.769 25.91,115.799 27.942,113.767 34.292,113.767 35.675,115.15 35.675,142.864 28.958,149.581 28.958,154.407

## Keep-outs
Keep-Out Layer:
  circle w0.254: c170.002,5.022 r1.27
  circle w0.254: c170.002,175.022 r1.27
  circle w0.254: c335.002,175.022 r1.27
  circle w0.254: c335.002,5.022 r1.27
  circle w0.254: c5.002,5.022 r1.27
  circle w0.254: c5.002,175.022 r1.27
  lines w0.254: 0.002,5.022 ccw(c5.002,5.022) 5.002,0.022 335.028,0.022 ; 0.002,5.055 0.002,175.022 cw(c5.002,175.022) 5.002,180.022 335.028,180.022 ; 335.002,0.022 ccw(c335.002,5.022) 340.002,5.022 ; 335.002,180.022 cw(c335.002,175.022) 340.002,175.022 340.002,5.055

## Other copper
Top Layer:
  rectangle net GND: 61.55,151.1 65.975,155.625
  rectangle net GND: 64.85,150.575 65.45,151.175
  rectangle net GND: 127.125,150 131.475,155.725
  rectangle net NetTP25_1: 299.933,134.557 303.758,138.282
  rectangle net NetTP31_1: 201.65,132.675 206.4,137
  rectangle net NetTP25_1: 190.05,114.275 202.275,122.3
  rectangle net NetR26_1: 125.732,96.622 135.13,124.562
  rectangle net NetC15_2: 316.613,57.633 334.774,66.45
  rectangle net NetC15_2: 273.687,47.346 285.117,69.19
  rectangle net NetC15_2: 268.226,50.267 273.941,67.92
  rectangle net NetC15_2: 273.814,89.637 284.228,109.957
  rectangle net NetC15_2: 268,91.725 273.588,108.489
  rectangle net Net*PWM1_17: 99.824,55.22 103.507,60.173
  rectangle net Net*PWM1_17: 99.951,69.952 103.761,75.159
  rectangle net Net*PWM1_17: 69.09,139.802 77.599,147.775
  rectangle net NetC10_1: 124.843,55.22 131.45,88.113
  rectangle net NetC10_1: 139.194,74.397 149.989,82.652
  rectangle net NetR26_1: 126.875,94.59 150.497,102.083
  rectangle net Net*PWM1_13: 123.7,126.467 133.352,134.849
  rectangle net Net*PWM1_13: 121.541,148.438 125.986,154.28
  rectangle net Net*PWM1_13: 94.49,149.835 98.808,154.28
  rectangle net NetQ1_2: 25.91,113.386 35.689,120.244
  pour cut-out: 298.6,54.5 301.375,54.5 302.85,55.975 302.85,58.275 301.175,59.95 298.675,59.95 297.15,58.425 297.15,55.95
  pour cut-out: 319.175,79.2 333,79.2 335.033,81.233 335.033,84.892 333.15,86.775 319.05,86.775 317.175,84.9 317.175,81.2
  text "b" at 157.425,6.671 h25
Bottom Layer:
  rectangle net VCC: 38.8,119.525 43.475,123.25
  rectangle net GND: 126.9,148.625 132.375,155.325
  rectangle net NetC9_2: 55.125,90.225 59.525,94.4
  rectangle net GND: 55.525,55.55 83.5,61.15
  rectangle net GND: 125.25,157.125 127.625,162.4
  rectangle net NetTP31_1: 202.4,133.1 206,136.4
  rectangle net Net*PWM1_17: 44.4,142.8 48.7,146.6
  rectangle net "VCC +320": 302.3,43.536 308.231,49.35
  rectangle net NetTP31_1: 189.85,124.825 202.05,133.65
  rectangle net NetTP31_1: 273.325,149.475 279.175,155.275
  rectangle net NetL2_5: 207.901,106.274 224.157,113.975
  rectangle net "VCC +320": 315.597,69.317 335.028,77.064
  rectangle net GND_II: 302.262,105.639 309.12,114.021
  rectangle net GND_II: 315.851,148.946 323.979,155.296
  rectangle net GND_II: 283.25,149.668 290.705,154.534
  rectangle net NetL2_5: 207.901,49.759 223.395,67.92
  rectangle net NetL2_5: 189.486,94.717 223.395,111.862
  rectangle net NetC9_2: 55.374,86.335 81.536,91.034
  rectangle net Net*PWM1_17: 68.386,140.945 77.218,148.057
  rectangle net NetC14_1: 99.189,82.906 103.761,87.986
  rectangle net NetC14_1: 92.966,97.003 98.046,102.972
  rectangle net NetC9_2: 59.692,108.179 65.28,114.402
  rectangle net NetC9_2: 4.9,92.1 21.775,110.338
  rectangle net VCC: 58.549,118.593 65.407,124.689
  rectangle net NetQ1_2: 88.902,149.962 93.347,154.28
  rectangle net Net*PWM1_17: 56.325,147.55 60.77,153.9
  rectangle net Net*PWM1_17: 29.593,149.327 33.784,154.407
  rectangle net VCC: 36.451,113.513 48.262,119.736
  rectangle net VCC: 5.082,112.497 21.973,129.896
  pour cut-out: 100.7,58.975 99.725,58 99.725,56.3 100.65,55.375 102.6,55.375 103.475,56.25 103.475,58.025 102.525,58.975
  text "b" at 182.425,6.621 h25

## Silkscreen, mask and mechanical layers (free items; w line width, h text height)
Top Overlay:
  circle w1: c170.002,5.022 r2
  circle w1: c170.002,175.022 r2
  circle w1: c335.002,175.022 r2
  circle w1: c335.002,5.022 r2
  circle w1: c5.002,5.022 r2
  circle w1: c5.002,175.022 r2
  text "IN_DC" at 7.225,149.275 h3 r270
  text "VCC" at 0.454,127.896 h1.52 r270
  text "VCC" at 0.454,118.621 h1.52 r270
  text "GND" at 0.454,108.096 h1.5 r270
  text "GND" at 0.454,98.496 h1.5 r270
  text "OUT_DC" at 329.15,91.7 h3 r90
  text "GND" at 339.171,81.129 h1.5 r90
  text "VCC" at 339.146,71.129 h1.5 r90
  text "GND" at 11.404,57.979 h1
  text "NEUTRAL" at 339.146,57.954 h1.5 r90
  text "FDB_2" at 11.429,55.121 h1
  text "FDB_1" at 11.404,52.521 h1
  text "+5V ISOL" at 8.904,36.679 h1
  text "SDA" at 8.979,34.079 h1
  text "GND" at 338.396,32.754 h1.2 r90
  text "SCL" at 9.054,31.504 h1
  text "GND ISOL" at 9.079,28.854 h1
  text "+18" at 338.396,27.229 h1.2 r90
  text "+12" at 338.396,21.004 h1.2 r90
  text "T_ADC" at 0.671,18.621 h1 r270
  text "SDA" at 19.096,11.604 h1 r90
  text "GND" at 0.429,11.496 h1 r270
  text "GND" at 24.271,11.479 h1 r90
  text "SCL" at 21.621,11.454 h1 r90
  text "+5V" at 16.521,11.179 h1 r90
  text "b" at 157.425,6.721 h25
  text "+5V" at 72.029,1.254 h1.2
  text "GND" at 77.529,1.254 h1.2
  text "+18V" at 82.229,1.254 h1.2
  text "+12V" at 87.929,1.254 h1.2
  text "GND" at 93.794,1.254 h1.2
  text "A_K" at 50.354,1.179 h1.2
Top Solder:
  lines w4: 26.4,152.475 26.4,143.175 30.675,138.9 30.675,119.375 ; 63.7,152.175 65.225,153.7 65.225,162.9 71.25,168.925 116.675,168.925 129.036,156.564 129.036,152.387 ; 75.2,140.725 75.2,107.05 90.6,91.65 90.6,83.525 101.379,72.746 101.602,72.746 101.602,57.125 ; 96.775,152.225 106.4,142.6 117,142.6 130.275,129.325 ; 126.525,57.475 126.525,72.625 132.225,78.325 144.175,78.325 ; 130.425,121.925 130.425,101.175 133.3,98.3 141.8,98.3 ; 194.9,118.175 205.5,118.175 209.7,122.375 220.175,122.375 232.65,134.85 296.175,134.85 308.35,147.025 308.35,152.013 ; 195.375,128.4 197.775,128.4 207.3,137.925 213.175,137.925 221.275,146.025 221.275,151.15 221.45,151.325 ; 210.541,152.022 210.541,159.016 211.451,159.926 ; 242.85,152.3 242.85,171.162 ; 254.125,134.875 254.125,151.35 ; 281.2,53.85 281.2,105.4 ; 282.75,59.6 284.35,59.6 294.675,49.275 307.025,49.275 320.775,63.025 330.675,63.025 ; 331.475,73.075 320.475,73.075 312.225,81.325 312.225,92.8 329.075,109.65 329.075,159.525 317.225,171.375 222.9,171.375 210.975,159.45 ; 210.975,159.45 210.975,159.45
Bottom Solder:
  lines w3: 7.793,121.768 55.293,121.768 ; 7.825,100.625 62.225,100.625 71.075,91.775 ; 35.3,135.175 79.6,135.175 91.05,146.625 91.05,152.125 ; 40.65,116.175 49.7,116.175 55.293,121.768 ; 57.075,58.875 86.7,58.875 92.1,64.275 107.55,64.275 116.525,73.25 116.525,97.475 110.775,103.225 110.775,111.775 119.525,120.525 119.525,134.925 129.1,144.5 129.1,160.1 131.725,162.725 ; 62.486,121.768 55.293,121.768 ; 62.55,101.15 62.55,110.65
  lines w4: 195.9,128.25 195.9,154.475 211.15,169.725 270.575,169.725 275.741,164.559 275.741,152.022 ; 286.663,152.022 286.663,161.663 296.4,171.4 305.875,171.4 319.263,158.012 319.263,139.531 305.207,125.475 ; 299.85,98.9 299.85,115.75 305.075,120.975 305.075,125.25 ; 300,57.211 301.886,57.211 310.925,66.25 310.925,68.225 315.75,73.05 330.795,73.05 331.06,73.315 ; 300.25,56.961 305.207,52.004 305.207,30.975 ; 300.382,99.182 308.143,99.182 312.65,94.675 312.65,91.225 320.75,83.125 321.175,83.125 320.925,82.875 331.225,82.875 ; 316.725,101.65 316.725,123.125 ; 327.375,81.875 327.375,148.625 ; 330.75,82.4 331.7,83.35
  lines w6: 196.275,104.725 196.275,104.05 223.025,104.05 229.75,97.325 229.75,65.925 222.6,58.775 211.175,58.775
  text "b" at 182.425,6.621 h25